# Altium PCB PCB1_1.pcbdoc (part 3 of 3)
Units mil, origin at the board's own origin, x right, y up, seen from the top; angles counter-clockwise.
Board outline 3937.01 x 3937.01 mil, 6 copper layers (Top Layer, Inner1, Inner2, Inner3, Inner4, Bottom Layer), stack 60.565 mil thick; 226 components, 112 nets, 767 pads, 893 vias.
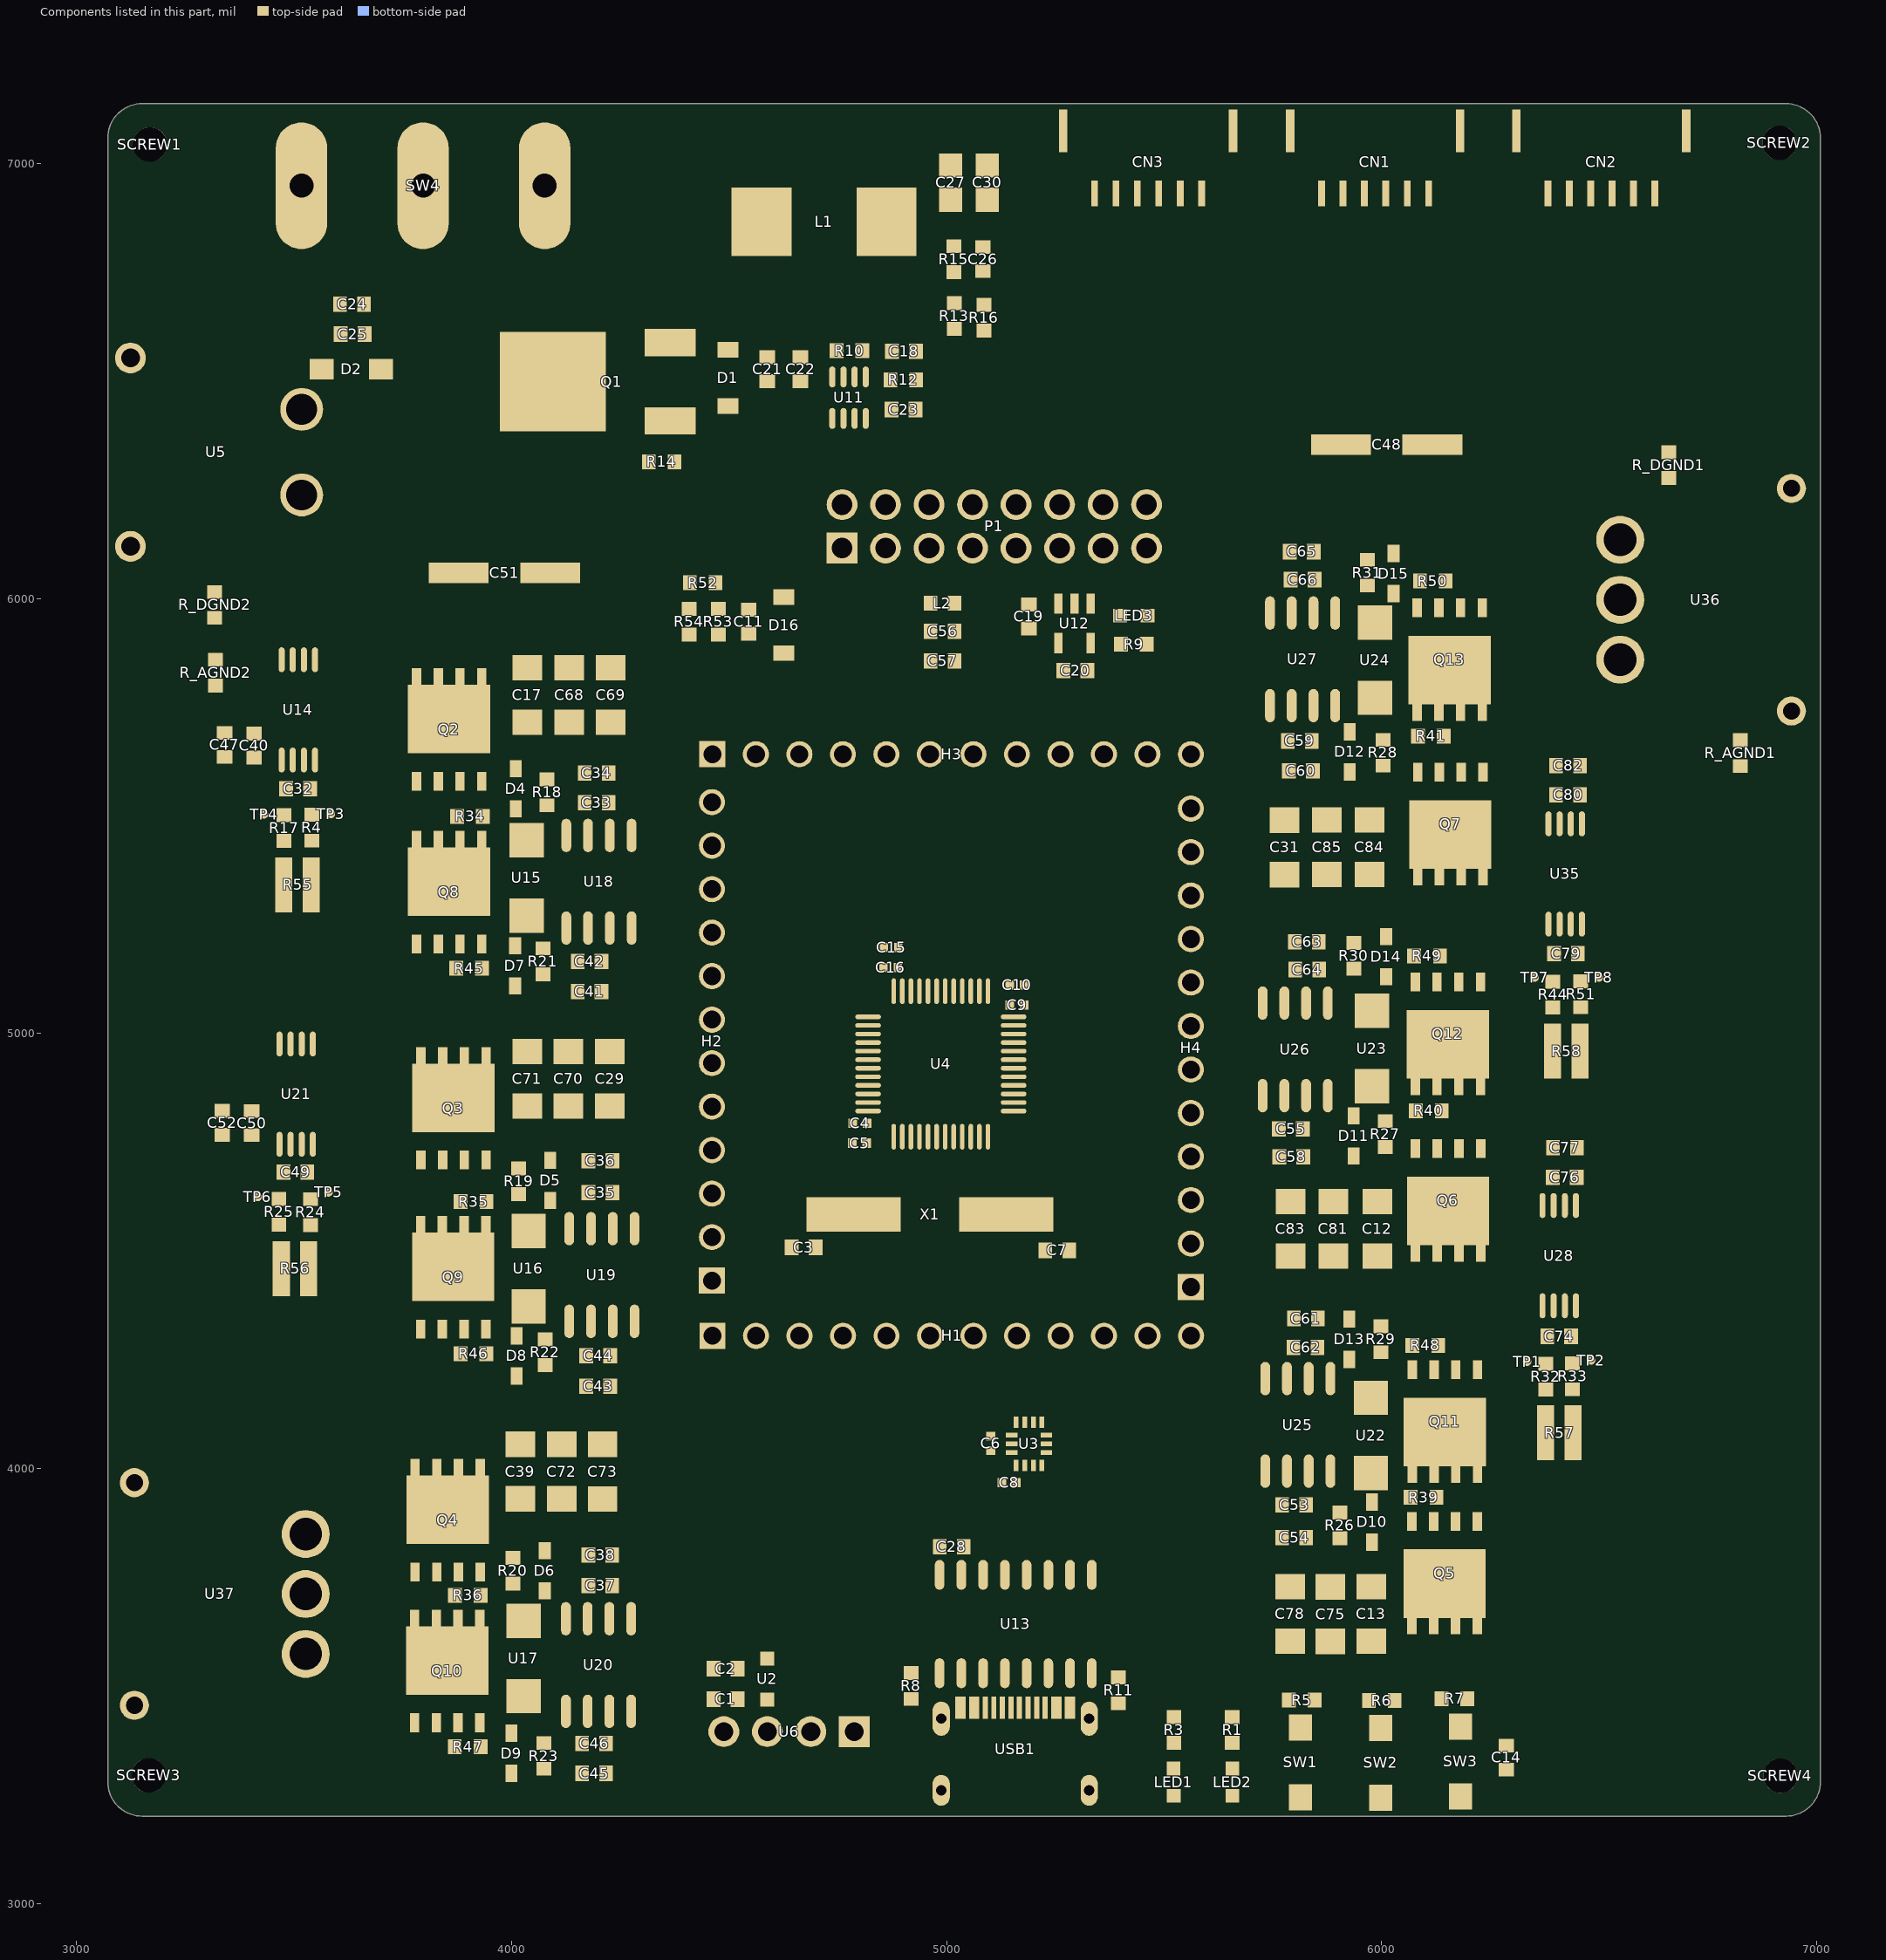
[diagram p7: the components of this part, seen from the top]

## Polygon pours and split planes (outlines as drawn) (continued)
VDDA on Inner1 (solid, remove dead copper): 5868.01,5758.9 6664.82,5758.9 6667.87,5761.95 6667.87,4163.33 6265.99,3761.45 4108.38,3761.45 3171.87,4697.95 3171.87,5703.81 3425.87,5957.81 3425.87,5959.95 5507.87,5959.95 5533.87,5933.95 5533.87,5662.4 5513.8,5642.33 3531.32,5642.33 3509.88,5620.89 3509.88,4721.95 3581.56,4650.27 4273.74,4650.27 4359.87,4564.13 4359.87,4245.95 4487.87,4117.95 5215.87,4117.95 5301.87,4031.95 5523.87,4031.95 5665.87,4173.95 5665.87,4487.04 5665.9,4487.06 6256.98,4487.06 6379.87,4609.95 6379.87,4666.07 6261.78,4784.16 6138.33,4784.16 5868.01,5054.49

## Keep-outs
Board Outline Layer:
  the board outline again, w10